# Altium PCB STM32H743I-EVAL2PCBDESIGN.PcbDoc (part 2 of 23)
Units mil, origin at the board's own origin, x right, y up, seen from the top; angles counter-clockwise.
Board outline 6558 x 5417 mil, 8 copper layers (L1_TOP, L2_GND, L3_HS1, L4_POWER, L5_SIG, L6_HS2, L7_GND, L8_BOTTOM), stack 61.368 mil thick; 620 components, 588 nets, 2945 pads, 1724 vias.
Unrouted connection lines stored in the file: 1.
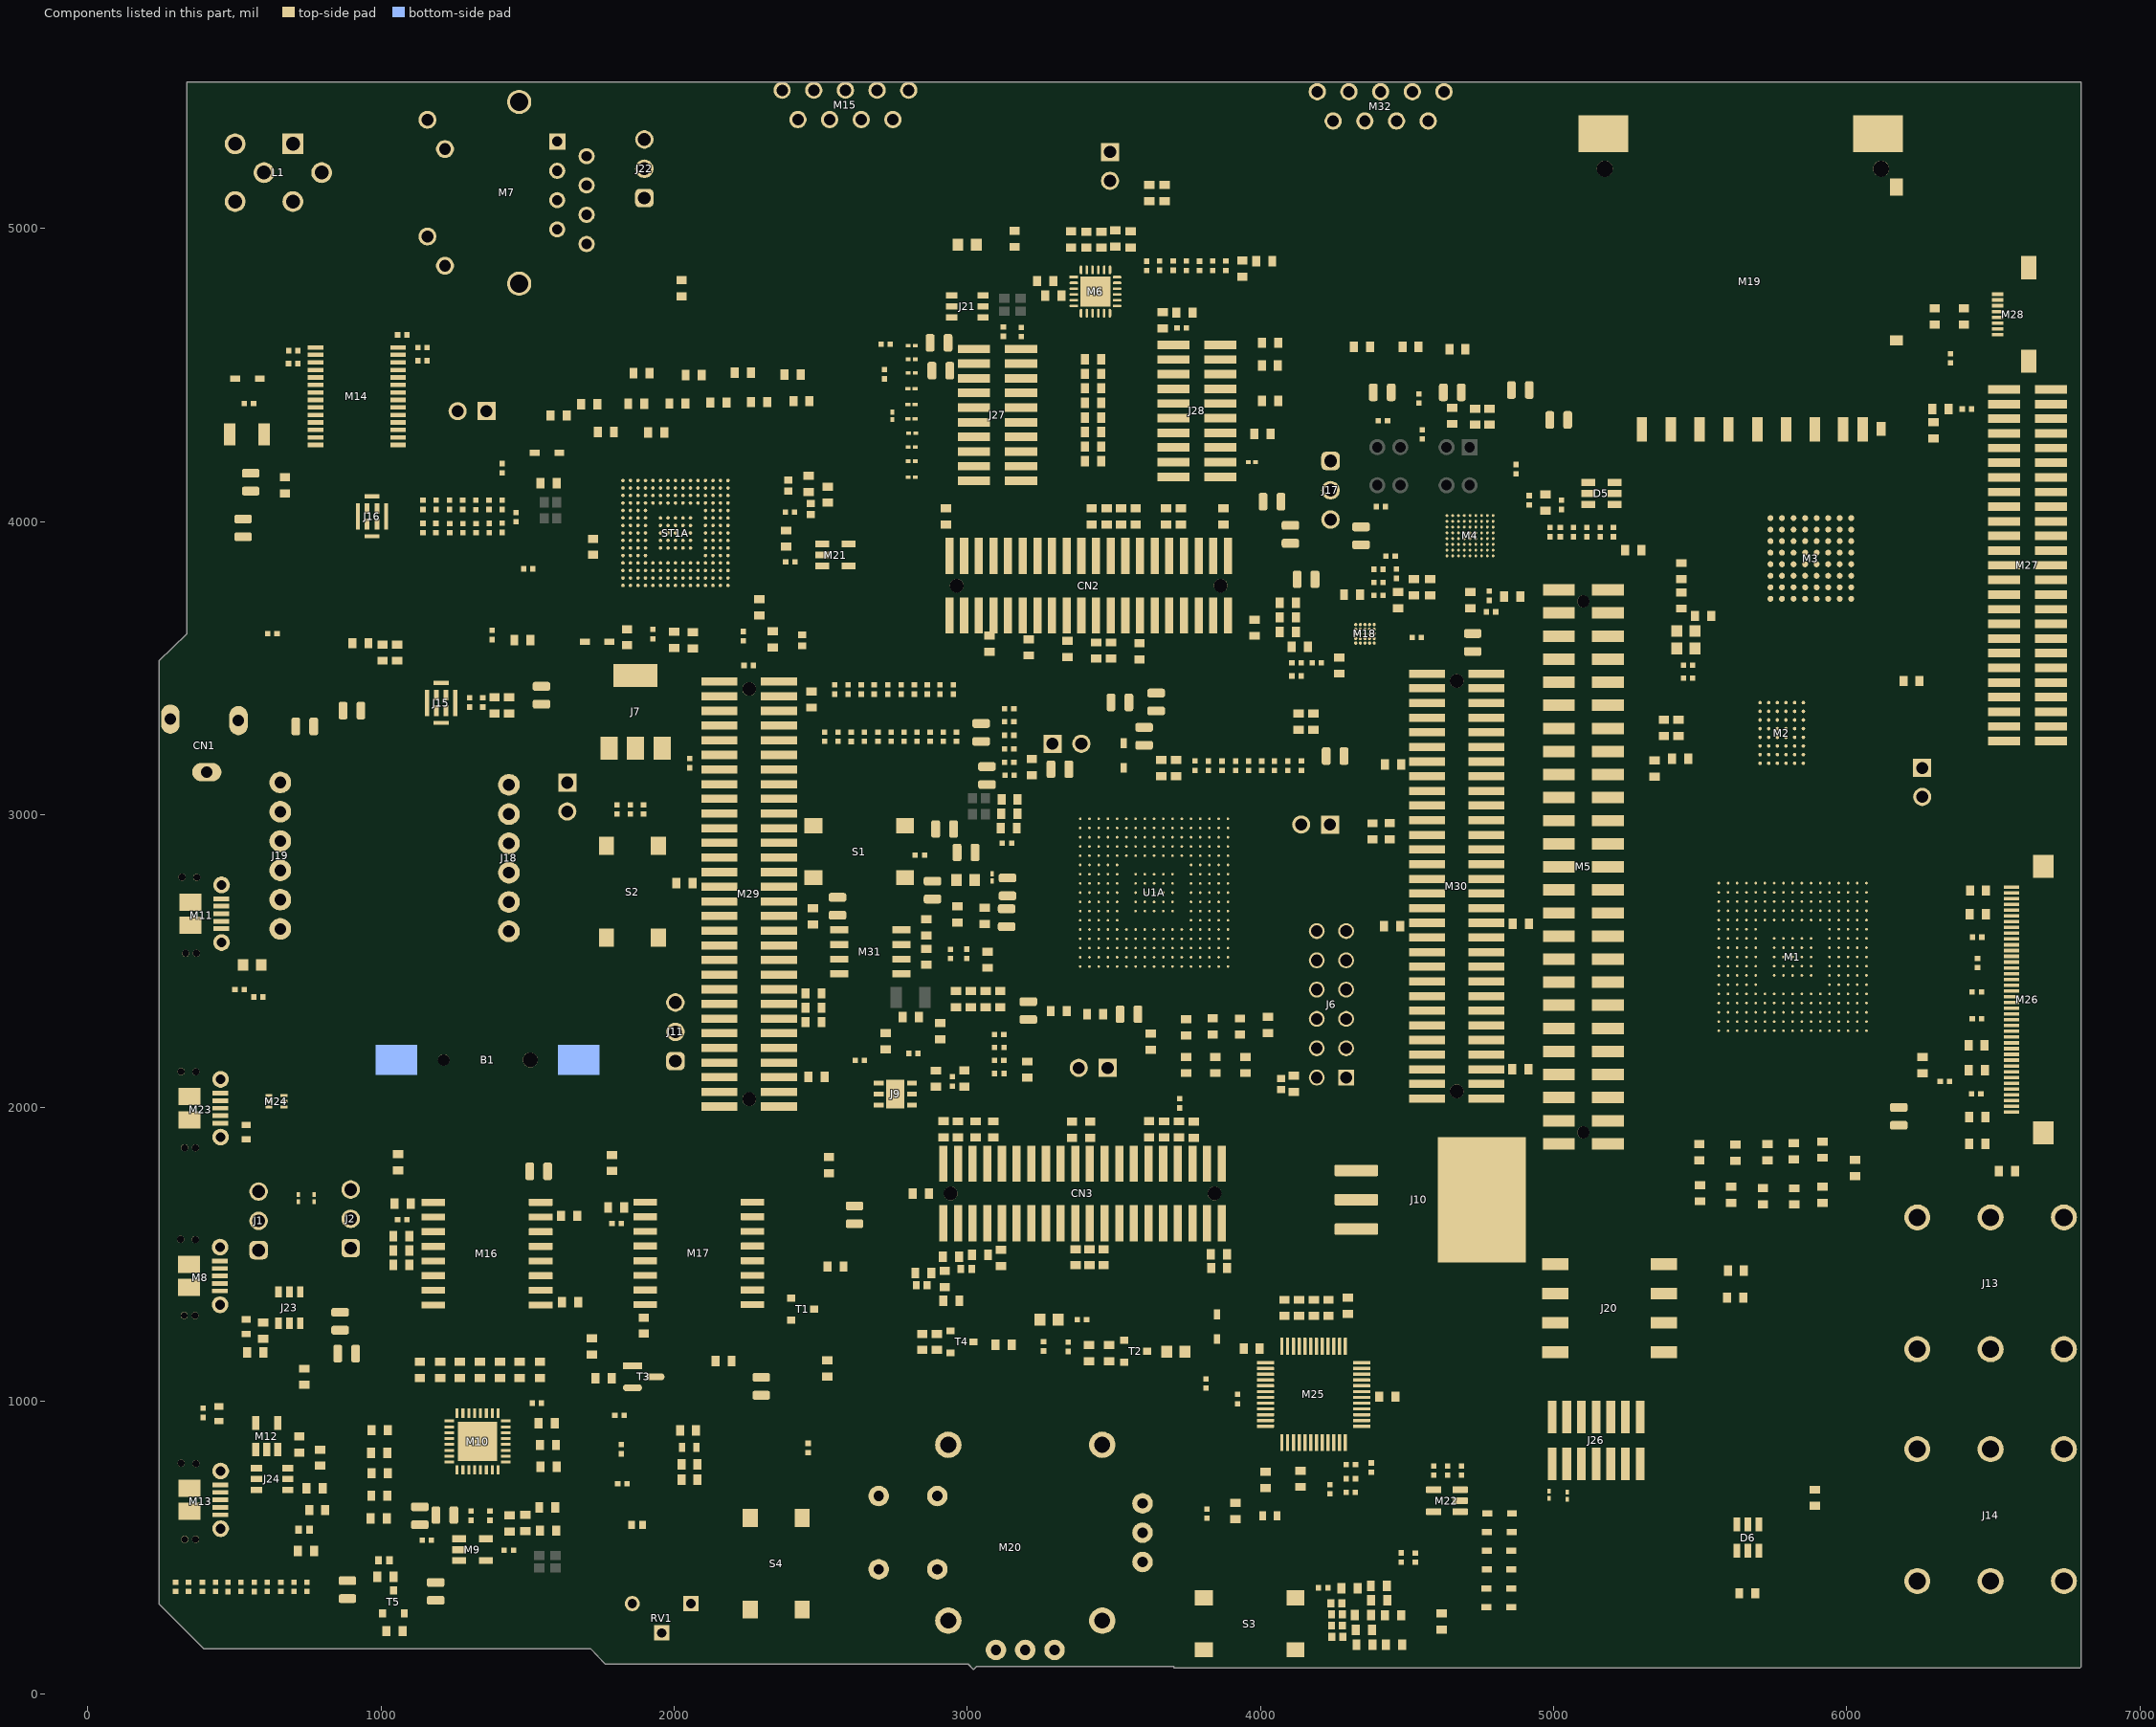
[diagram p8: the components of this part, seen from the top]

## Footprints (in the part's own frame and the unit in brackets; to place one, negate y for a bottom-side part, rotate by r counter-clockwise, add the part's x,y. Pads: shape width x height; smd on the part's side, far side on the other; paste and mask are expansions set on the pad) (continued)
FP-PTS645SH50SMTR92LFS-MFG [mm]
  rect 1.55x1.3 smd paste+0 mask+0: 1(-3.975,2.25) 2(3.975,2.25) 3(-3.975,-2.25) 4(3.975,-2.25)
  silkscreen extent -3,-3 3,3, body extent -4.63,-2.87 4.37,3.13, height 4.3
FP-QFN-6L-MFG [mm]
  rect 0.6x0.25 smd paste+0 mask+0: 1(-0.65,0.5) 2(-0.65,0) 3(-0.65,-0.5) 4(0.65,-0.5) 5(0.65,0) 6(0.65,0.5)
  body extent -1.05,-0.97 1.05,0.97, height 0.25
FP-SOT23-5L-7049676-MFG [mm]
  rect 1.2x0.6 smd paste+0 mask+0: 1(-1.15,0.95) 2(-1.15,0) 3(-1.15,-0.95) 4(1.15,-0.95) 5(1.15,0.95)
  silkscreen extent -0.18,-1.48 0.8,1.47, body extent -1.85,-1.58 1.85,1.57, height 0.25
FP-SOT23-6L-MFG [mm]
  rect 1.2x0.6 smd paste+0 mask+0: 1(-1.15,0.95) 2(-1.15,0) 3(-1.15,-0.95) 4(1.15,-0.95) 5(1.15,0) 6(1.15,0.95)
  silkscreen extent -0.18,-1.53 0.18,1.53, body extent -1.85,-1.63 1.85,1.63, height 0.25
FP-SOT23-IPC_A [mm]
  rect 1.655x0.602 smd paste+0 mask+0: 1(-0.975,0.95)
  rrect100% 1.655x0.602 smd paste+0 mask+0: 2(-0.975,-0.95) 3(0.975,0)
  body extent -2.3,-1.95 2.3,1.95, height 0.25
FP-SOT23-MFG [mm]
  rect 0.7x0.6 smd paste-1000 mask+0: 1(-1,0.95) 2(-1,-0.95) 3(1,0)
  silkscreen extent -0.7,-1.5 0.7,1.5, body extent -1.5,-1.65 1.5,1.65, height 0.25
FP-TFBGA240+25-A07U-MFG [mm]
  round 0.225 smd paste-1000 mask+0: A1(-6.4,6.4) A2(-5.6,6.4) A3(-4.8,6.4) A4(-4,6.4) A5(-3.2,6.4) A6(-2.4,6.4) A7(-1.6,6.4) A8(-0.8,6.4) A9(0,6.4) A10(0.8,6.4) A11(1.6,6.4) A12(2.4,6.4) A13(3.2,6.4) A14(4,6.4) A15(4.8,6.4) A16(5.6,6.4) A17(6.4,6.4) B1(-6.4,5.6) B2(-5.6,5.6) B3(-4.8,5.6) B4(-4,5.6) B5(-3.2,5.6) B6(-2.4,5.6) B7(-1.6,5.6) B8(-0.8,5.6) B9(0,5.6) B10(0.8,5.6) B11(1.6,5.6) B12(2.4,5.6) B13(3.2,5.6) B14(4,5.6) B15(4.8,5.6) B16(5.6,5.6) B17(6.4,5.6) C1(-6.4,4.8) C2(-5.6,4.8) C3(-4.8,4.8) C4(-4,4.8) C5(-3.2,4.8) C6(-2.4,4.8) C7(-1.6,4.8) C8(-0.8,4.8) C9(0,4.8) C10(0.8,4.8) C11(1.6,4.8) C12(2.4,4.8) C13(3.2,4.8) C14(4,4.8) C15(4.8,4.8) C16(5.6,4.8) C17(6.4,4.8) D1(-6.4,4) D2(-5.6,4) D3(-4.8,4) D4(-4,4) D5(-3.2,4) D6(-2.4,4) D7(-1.6,4) D8(-0.8,4) D9(0,4) D10(0.8,4) D11(1.6,4) D12(2.4,4) D13(3.2,4) D14(4,4) D15(4.8,4) D16(5.6,4) D17(6.4,4) E1(-6.4,3.2) E2(-5.6,3.2) E3(-4.8,3.2) E4(-4,3.2) E5(-3.2,3.2) E6(-2.4,3.2) E7(-1.6,3.2) E8(-0.8,3.2) E9(0,3.2) E10(0.8,3.2) E11(1.6,3.2) E12(2.4,3.2) E13(3.2,3.2) E14(4,3.2) E15(4.8,3.2) E16(5.6,3.2) E17(6.4,3.2) F1(-6.4,2.4) F2(-5.6,2.4) F3(-4.8,2.4) F4(-4,2.4) F5(-3.2,2.4) F13(3.2,2.4) F14(4,2.4) F15(4.8,2.4) F16(5.6,2.4) F17(6.4,2.4) G1(-6.4,1.6) G2(-5.6,1.6) G3(-4.8,1.6) G4(-4,1.6) G5(-3.2,1.6) G7(-1.6,1.6) G8(-0.8,1.6) G9(0,1.6) G10(0.8,1.6) G11(1.6,1.6) G13(3.2,1.6) G14(4,1.6) G15(4.8,1.6) G16(5.6,1.6) G17(6.4,1.6) H1(-6.4,0.8) H2(-5.6,0.8) H3(-4.8,0.8) H4(-4,0.8) H5(-3.2,0.8) H7(-1.6,0.8) H8(-0.8,0.8) H9(0,0.8) H10(0.8,0.8) H11(1.6,0.8) H13(3.2,0.8) H14(4,0.8) H15(4.8,0.8) H16(5.6,0.8) H17(6.4,0.8) J1(-6.4,0) J2(-5.6,0) J3(-4.8,0) J4(-4,0) J5(-3.2,0) J7(-1.6,0) J8(-0.8,0) J9(0,0) J10(0.8,0) J11(1.6,0) J13(3.2,0) J14(4,0) J15(4.8,0) J16(5.6,0) J17(6.4,0) K1(-6.4,-0.8) K2(-5.6,-0.8) K3(-4.8,-0.8) K4(-4,-0.8) K5(-3.2,-0.8) K7(-1.6,-0.8) K8(-0.8,-0.8) K9(0,-0.8) K10(0.8,-0.8) K11(1.6,-0.8) K13(3.2,-0.8) K14(4,-0.8) K15(4.8,-0.8) K16(5.6,-0.8) K17(6.4,-0.8) L1(-6.4,-1.6) L2(-5.6,-1.6) L3(-4.8,-1.6) L4(-4,-1.6) L5(-3.2,-1.6) L7(-1.6,-1.6) L8(-0.8,-1.6) L9(0,-1.6) L10(0.8,-1.6) L11(1.6,-1.6) L13(3.2,-1.6) L14(4,-1.6) L15(4.8,-1.6) L16(5.6,-1.6) L17(6.4,-1.6) M1(-6.4,-2.4) M2(-5.6,-2.4) M3(-4.8,-2.4) M4(-4,-2.4) M5(-3.2,-2.4) M13(3.2,-2.4) M14(4,-2.4) M15(4.8,-2.4) M16(5.6,-2.4) M17(6.4,-2.4) N1(-6.4,-3.2) N2(-5.6,-3.2) N3(-4.8,-3.2) N4(-4,-3.2) N5(-3.2,-3.2) N6(-2.4,-3.2) N7(-1.6,-3.2) N8(-0.8,-3.2) N9(0,-3.2) N10(0.8,-3.2) N11(1.6,-3.2) N12(2.4,-3.2) N13(3.2,-3.2) N14(4,-3.2) N15(4.8,-3.2) N16(5.6,-3.2) N17(6.4,-3.2) P1(-6.4,-4) P2(-5.6,-4) P3(-4.8,-4) P4(-4,-4) P5(-3.2,-4) P6(-2.4,-4) P7(-1.6,-4) P8(-0.8,-4) P9(0,-4) P10(0.8,-4) P11(1.6,-4) P12(2.4,-4) P13(3.2,-4) P14(4,-4) P15(4.8,-4) P16(5.6,-4) P17(6.4,-4) R1(-6.4,-4.8) R2(-5.6,-4.8) R3(-4.8,-4.8) R4(-4,-4.8) R5(-3.2,-4.8) R6(-2.4,-4.8) R7(-1.6,-4.8) R8(-0.8,-4.8) R9(0,-4.8) R10(0.8,-4.8) R11(1.6,-4.8) R12(2.4,-4.8) R13(3.2,-4.8) R14(4,-4.8) R15(4.8,-4.8) R16(5.6,-4.8) R17(6.4,-4.8) T1(-6.4,-5.6) T2(-5.6,-5.6) T3(-4.8,-5.6) T4(-4,-5.6) T5(-3.2,-5.6) T6(-2.4,-5.6) T7(-1.6,-5.6) T8(-0.8,-5.6) T9(0,-5.6) T10(0.8,-5.6) T11(1.6,-5.6) T12(2.4,-5.6) T13(3.2,-5.6) T14(4,-5.6) T15(4.8,-5.6) T16(5.6,-5.6) T17(6.4,-5.6) U1(-6.4,-6.4) U2(-5.6,-6.4) U3(-4.8,-6.4) U4(-4,-6.4) U5(-3.2,-6.4) U6(-2.4,-6.4) U7(-1.6,-6.4) U8(-0.8,-6.4) U9(0,-6.4) U10(0.8,-6.4) U11(1.6,-6.4) U12(2.4,-6.4) U13(3.2,-6.4) U14(4,-6.4) U15(4.8,-6.4) U16(5.6,-6.4) U17(6.4,-6.4)
  silkscreen extent -8.1,-7.07 7.07,7.07, body extent -7.57,-7.57 7.57,7.57, height 0.25
IC_STM32F723IEK6 [mm]
  round 0.3 smd mask+0.05: A1(-4.55,4.55) A2(-3.9,4.55) A3(-3.25,4.55) A4(-2.6,4.55) A5(-1.95,4.55) A6(-1.3,4.55) A7(-0.65,4.55) A8(0,4.55) A9(0.65,4.55) A10(1.3,4.55) A11(1.95,4.55) A12(2.6,4.55) A13(3.25,4.55) A14(3.9,4.55) A15(4.55,4.55) B1(-4.55,3.9) B2(-3.9,3.9) B3(-3.25,3.9) B4(-2.6,3.9) B5(-1.95,3.9) B6(-1.3,3.9) B7(-0.65,3.9) B8(0,3.9) B9(0.65,3.9) B10(1.3,3.9) B11(1.95,3.9) B12(2.6,3.9) B13(3.25,3.9) B14(3.9,3.9) B15(4.55,3.9) C1(-4.55,3.25) C2(-3.9,3.25) C3(-3.25,3.25) C4(-2.6,3.25) C5(-1.95,3.25) C6(-1.3,3.25) C7(-0.65,3.25) C8(0,3.25) C9(0.65,3.25) C10(1.3,3.25) C11(1.95,3.25) C12(2.6,3.25) C13(3.25,3.25) C14(3.9,3.25) C15(4.55,3.25) D1(-4.55,2.6) D2(-3.9,2.6) D3(-3.25,2.6) D4(-2.6,2.6) D5(-1.95,2.6) D6(-1.3,2.6) D7(-0.65,2.6) D8(0,2.6) D9(0.65,2.6) D10(1.3,2.6) D11(1.95,2.6) D12(2.6,2.6) D13(3.25,2.6) D14(3.9,2.6) D15(4.55,2.6) E1(-4.55,1.95) E2(-3.9,1.95) E3(-3.25,1.95) E4(-2.6,1.95) E12(2.6,1.95) E13(3.25,1.95) E14(3.9,1.95) E15(4.55,1.95) F1(-4.55,1.3) F2(-3.9,1.3) F3(-3.25,1.3) F4(-2.6,1.3) F6(-1.3,1.3) F7(-0.65,1.3) F8(0,1.3) F9(0.65,1.3) F10(1.3,1.3) F12(2.6,1.3) F13(3.25,1.3) F14(3.9,1.3) F15(4.55,1.3) G1(-4.55,0.65) G2(-3.9,0.65) G3(-3.25,0.65) G4(-2.6,0.65) G6(-1.3,0.65) G7(-0.65,0.65) G8(0,0.65) G9(0.65,0.65) G10(1.3,0.65) G12(2.6,0.65) G13(3.25,0.65) G14(3.9,0.65) G15(4.55,0.65) H1(-4.55,0) H2(-3.9,0) H3(-3.25,0) H4(-2.6,0) H6(-1.3,0) H7(-0.65,0) H8(0,0) H9(0.65,0) H10(1.3,0) H12(2.6,0) H13(3.25,0) H14(3.9,0) H15(4.55,0) J1(-4.55,-0.65) J2(-3.9,-0.65) J3(-3.25,-0.65) J4(-2.6,-0.65) J6(-1.3,-0.65) J7(-0.65,-0.65) J8(0,-0.65) J9(0.65,-0.65) J10(1.3,-0.65) J12(2.6,-0.65) J13(3.25,-0.65) J14(3.9,-0.65) J15(4.55,-0.65) K1(-4.55,-1.3) K2(-3.9,-1.3) K3(-3.25,-1.3) K4(-2.6,-1.3) K6(-1.3,-1.3) K7(-0.65,-1.3) K8(0,-1.3) K9(0.65,-1.3) K10(1.3,-1.3) K12(2.6,-1.3) K13(3.25,-1.3) K14(3.9,-1.3) K15(4.55,-1.3) L1(-4.55,-1.95) L2(-3.9,-1.95) L3(-3.25,-1.95) L4(-2.6,-1.95) L12(2.6,-1.95) L13(3.25,-1.95) L14(3.9,-1.95) L15(4.55,-1.95) M1(-4.55,-2.6) M2(-3.9,-2.6) M3(-3.25,-2.6) M4(-2.6,-2.6) M5(-1.95,-2.6) M6(-1.3,-2.6) M7(-0.65,-2.6) M8(0,-2.6) M9(0.65,-2.6) M10(1.3,-2.6) M11(1.95,-2.6) M12(2.6,-2.6) M13(3.25,-2.6) M14(3.9,-2.6) M15(4.55,-2.6) N1(-4.55,-3.25) N2(-3.9,-3.25) N3(-3.25,-3.25) N4(-2.6,-3.25) N5(-1.95,-3.25) N6(-1.3,-3.25) N7(-0.65,-3.25) N8(0,-3.25) N9(0.65,-3.25) N10(1.3,-3.25) N11(1.95,-3.25) N12(2.6,-3.25) N13(3.25,-3.25) N14(3.9,-3.25) N15(4.55,-3.25) P1(-4.55,-3.9) P2(-3.9,-3.9) P3(-3.25,-3.9) P4(-2.6,-3.9) P5(-1.95,-3.9) P6(-1.3,-3.9) P7(-0.65,-3.9) P8(0,-3.9) P9(0.65,-3.9) P10(1.3,-3.9) P11(1.95,-3.9) P12(2.6,-3.9) P13(3.25,-3.9) P14(3.9,-3.9) P15(4.55,-3.9) R1(-4.55,-4.55) R2(-3.9,-4.55) R3(-3.25,-4.55) R4(-2.6,-4.55) R5(-1.95,-4.55) R6(-1.3,-4.55) R7(-0.65,-4.55) R8(0,-4.55) R9(0.65,-4.55) R10(1.3,-4.55) R11(1.95,-4.55) R12(2.6,-4.55) R13(3.25,-4.55) R14(3.9,-4.55) R15(4.55,-4.55)
  silkscreen extent -5.6,4.65 -5.4,4.85, body extent -5,-5 5,5, height 0.6
ISSI-TF-BGA-48-9000X11000DE [mm] "BGA, 48-Balls, Body 11x9mm, Pitch 0.75mm"
  round 0.3 smd: A1(-1.875,2.625) A2(-1.125,2.625) A3(-0.375,2.625) A4(0.375,2.625) A5(1.125,2.625) A6(1.875,2.625) B1(-1.875,1.875) B2(-1.125,1.875) B3(-0.375,1.875) B4(0.375,1.875) B5(1.125,1.875) B6(1.875,1.875) C1(-1.875,1.125) C2(-1.125,1.125) C3(-0.375,1.125) C4(0.375,1.125) C5(1.125,1.125) C6(1.875,1.125) D1(-1.875,0.375) D2(-1.125,0.375) D3(-0.375,0.375) D4(0.375,0.375) D5(1.125,0.375) D6(1.875,0.375) E1(-1.875,-0.375) E2(-1.125,-0.375) E3(-0.375,-0.375) E4(0.375,-0.375) E5(1.125,-0.375) E6(1.875,-0.375) F1(-1.875,-1.125) F2(-1.125,-1.125) F3(-0.375,-1.125) F4(0.375,-1.125) F5(1.125,-1.125) F6(1.875,-1.125) G1(-1.875,-1.875) G2(-1.125,-1.875) G3(-0.375,-1.875) G4(0.375,-1.875) G5(1.125,-1.875) G6(1.875,-1.875) H1(-1.875,-2.625) H2(-1.125,-2.625) H3(-0.375,-2.625) H4(0.375,-2.625) H5(1.125,-2.625) H6(1.875,-2.625)
  silkscreen extent -5.27,-5.5 4.5,5.5, body extent -4.5,-5.5 4.5,5.5, height 1.2
JST_B2B-XH-A [mm]
  rect 1.575x1.575 / inner round 1.575 / far side rect 1.575x1.575 hole 1.05: 1(1.25,-0.525)
  round 1.575 hole 1.05: 2(-1.25,-0.525)
  silkscreen extent -3.7,-2.88 3.7,2.88, body extent -3.57,-4.02 3.83,1.73, height 7.86
LBGA64_11X13_PC_MRN-M [mil]
  round 20 smd paste+0 mask+0: A1(-137.8,137.8) A2(-98.43,137.8) A3(-59.06,137.8) A4(-19.69,137.8) A5(19.68,137.8) A6(59.06,137.8) A7(98.43,137.8) A8(137.8,137.8) B1(-137.8,98.43) B2(-98.43,98.43) B3(-59.06,98.43) B4(-19.69,98.43) B5(19.68,98.43) B6(59.06,98.43) B7(98.43,98.43) B8(137.8,98.43) C1(-137.8,59.06) C2(-98.43,59.06) C3(-59.06,59.06) C4(-19.69,59.06) C5(19.68,59.06) C6(59.06,59.06) C7(98.43,59.06) C8(137.8,59.06) D1(-137.8,19.69) D2(-98.43,19.69) D3(-59.06,19.69) D4(-19.69,19.69) D5(19.68,19.69) D6(59.06,19.69) D7(98.43,19.69) D8(137.8,19.69) E1(-137.8,-19.68) E2(-98.43,-19.68) E3(-59.06,-19.68) E4(-19.69,-19.68) E5(19.68,-19.68) E6(59.06,-19.68) E7(98.43,-19.68) E8(137.8,-19.68) F1(-137.8,-59.06) F2(-98.43,-59.06) F3(-59.06,-59.06) F4(-19.69,-59.06) F5(19.68,-59.06) F6(59.06,-59.06) F7(98.43,-59.06) F8(137.8,-59.06) G1(-137.8,-98.43) G2(-98.43,-98.43) G3(-59.06,-98.43) G4(-19.69,-98.43) G5(19.68,-98.43) G6(59.06,-98.43) G7(98.43,-98.43) G8(137.8,-98.43) H1(-137.8,-137.8) H2(-98.43,-137.8) H3(-59.06,-137.8) H4(-19.69,-137.8) H5(19.68,-137.8) H6(59.06,-137.8) H7(98.43,-137.8) H8(137.8,-137.8)
  silkscreen extent -228,-268 228,268, body extent -219,-258 219,258, height 55
LEDGREEN [mm]
  rect 0.6x0.7 smd: 1(-0.475,0) 2(0.475,0)
  body extent -0.5,-0.3 0.5,0.3, height 0.21
LEDRED [mm]
  rect 0.6x0.7 smd: 1(-0.475,0) 2(0.475,0)
  body extent -0.53,-0.3 0.47,0.3, height 0.21
MLE_TSHC-106-D-06-240-F-LF [mil]
  rect 54x54 / inner round 54 / far side rect 54x54 hole 40 mask+4.02: 01(-250,-50)
  round 54 hole 40 mask+4.02: 02(-250,50) 03(-150,-50) 04(-150,50) 05(-50,-50) 06(-50,50) 07(50,-50) 08(50,50) 09(150,-50) 10(150,50) 11(250,-50) 12(250,50)
  body extent -300,-99 300,99, height 340
NET_TIE [mil]
  rrect50% 30x60 smd paste-30 mask+0: 1(-1,0) 2(60,0)
  L1_TOP region: 0,30 60,30 60,-30 0,-30
NEUTRIK_NRJ6HF [mm]
  round 2.25 hole 1.5: 1(6.35,5.715) 2(0,-5.715) 3(-6.35,5.715) 4(0,5.715) 10(6.35,-5.715) NC(-6.35,-5.715)
  silkscreen extent -13.7,-7.95 10.6,8.93, body extent -13.7,-7.95 19.5,7.81, height 12.7
POT_3386P [mil]
  round 52 / inner round 60 / far side round 52 hole 32 paste-99999 mask+0: 1(0,0)
  rect 52x52 / inner round 60 / far side rect 52x52 hole 32 paste-99999 mask+0: 2(100,-100) 3(200,0)
  silkscreen extent -142,-192 292,193, body extent -87,-200 290,187, height 392
PPPC061LGBN-RC [mil]
  round 74 hole 40: 1(-50,250) 2(-50,150) 3(-50,50) 4(-50,-50) 5(-50,-150) 6(-50,-250)
  body extent -76,-315 330,305, height 100
PULS-J00XXD21XNL-B-12 [mm] "RJ45, 12-Leads, Body 16.26x21.59mm, Pitch 1.27mm"
  rect 1.4x1.4 hole 0.89: 1(4.445,-6.35)
  round 1.4 hole 0.89: 2(3.175,-8.89) 3(1.905,-6.35) 4(0.635,-8.89) 5(-0.635,-6.35) 6(-1.905,-8.89) 7(-3.175,-6.35) 8(-4.445,-8.89)
  round 1.55 hole 1.02: 9(6.325,4.9) 10(3.785,3.38) 11(-3.785,4.9) 12(-6.325,3.38)
  round 2.1 hole 1.6: 13(7.875,-3.05) 14(-7.875,-3.05)
  silkscreen extent -8.13,-10.8 8.13,10.79, body extent -8.13,-10.79 8.13,10.8, height 17.13
QFN32_5X5MC_MCH [mil]
  rect 32x10 smd paste+0 mask+0: 1(-96.5,70) 2(-96.5,50) 3(-96.5,30) 4(-96.5,10) 5(-96.5,-10) 6(-96.5,-30) 7(-96.5,-50) 8(-96.5,-70) 17(96.5,-70) 18(96.5,-50) 19(96.5,-30) 20(96.5,-10) 21(96.5,10) 22(96.5,30) 23(96.5,50) 24(96.5,70)
  rect 10x32 smd paste+0 mask+0: 9(-70,-96.5) 10(-50,-96.5) 11(-30,-96.5) 12(-10,-96.5) 13(10,-96.5) 14(30,-96.5) 15(50,-96.5) 16(70,-96.5) 25(70,96.5) 26(50,96.5) 27(30,96.5) 28(10,96.5) 29(-10,96.5) 30(-30,96.5) 31(-50,96.5) 32(-70,96.5)
  rect 134x134 smd paste-66.5 mask-66.5: 33(0,0)
  silkscreen extent -103,-132 132,132, body extent -101,-101 101,101, height 65
QFP50P900X900X160-48N [mm]
  rrect25% 1.49x0.28 smd: 1(-4.17,2.75) 2(-4.17,2.25) 3(-4.17,1.75) 4(-4.17,1.25) 5(-4.17,0.75) 6(-4.17,0.25) 7(-4.17,-0.25) 8(-4.17,-0.75) 9(-4.17,-1.25) 10(-4.17,-1.75) 11(-4.17,-2.25) 12(-4.17,-2.75) 25(4.17,-2.75) 26(4.17,-2.25) 27(4.17,-1.75) 28(4.17,-1.25) 29(4.17,-0.75) 30(4.17,-0.25) 31(4.17,0.25) 32(4.17,0.75) 33(4.17,1.25) 34(4.17,1.75) 35(4.17,2.25) 36(4.17,2.75)
  rrect25% 0.28x1.49 smd: 13(-2.75,-4.17) 14(-2.25,-4.17) 15(-1.75,-4.17) 16(-1.25,-4.17) 17(-0.75,-4.17) 18(-0.25,-4.17) 19(0.25,-4.17) 20(0.75,-4.17) 21(1.25,-4.17) 22(1.75,-4.17) 23(2.25,-4.17) 24(2.75,-4.17) 37(2.75,4.17) 38(2.25,4.17) 39(1.75,4.17) 40(1.25,4.17) 41(0.75,4.17) 42(0.25,4.17) 43(-0.25,4.17) 44(-0.75,4.17) 45(-1.25,4.17) 46(-1.75,4.17) 47(-2.25,4.17) 48(-2.75,4.17)
  silkscreen extent -5.96,-3.55 3.55,3.55, body extent -4.5,-4.5 4.5,4.5, height 0.72
RESC1608X55X25NL10T15 [mm] "Chip Resistor, 2-Leads, Body 1.70x0.90mm, IPC Medium Density"
  rect 0.7x0.9 smd: 1(-0.7,0) 2(0.7,0)
  body extent -0.85,-0.45 0.85,0.45, height 0.55
SAMTEC_FTR-120-03-L-D-LC [mm]
  rect 0.711x3.125 smd: 01(-12.065,-2.578) 02(-12.065,2.578) 03(-10.795,-2.578) 04(-10.795,2.578) 05(-9.525,-2.578) 06(-9.525,2.578) 07(-8.255,-2.578) 08(-8.255,2.578) 09(-6.985,-2.578) 10(-6.985,2.578) 11(-5.715,-2.578) 12(-5.715,2.578) 13(-4.445,-2.578) 14(-4.445,2.578) 15(-3.175,-2.578) 16(-3.175,2.578) 17(-1.905,-2.578) 18(-1.905,2.578) 19(-0.635,-2.578) 20(-0.635,2.578) 21(0.635,-2.578) 22(0.635,2.578) 23(1.905,-2.578) 24(1.905,2.578) 25(3.175,-2.578) 26(3.175,2.578) 27(4.445,-2.578) 28(4.445,2.578) 29(5.715,-2.578) 30(5.715,2.578) 31(6.985,-2.578) 32(6.985,2.578) 33(8.255,-2.578) 34(8.255,2.578) 35(9.525,-2.578) 36(9.525,2.578) 37(10.795,-2.578) 38(10.795,2.578) 39(12.065,-2.578) 40(12.065,2.578)
  round 1.19 hole 1.19 unplated: ""(-11.43,0) ""(11.43,0)
  silkscreen extent -12.7,-5 12.7,0.66, body extent -12.83,-3.76 12.57,3.76, height 5.47
SAMTEC_FTR-130-03-L-D-LC [mm]
  rect 0.711x3.125 smd: 01(-18.415,-2.578) 02(-18.415,2.578) 03(-17.145,-2.578) 04(-17.145,2.578) 05(-15.875,-2.578) 06(-15.875,2.578) 07(-14.605,-2.578) 08(-14.605,2.578) 09(-13.335,-2.578) 10(-13.335,2.578) 11(-12.065,-2.578) 12(-12.065,2.578) 13(-10.795,-2.578) 14(-10.795,2.578) 15(-9.525,-2.578) 16(-9.525,2.578) 17(-8.255,-2.578) 18(-8.255,2.578) 19(-6.985,-2.578) 20(-6.985,2.578) 21(-5.715,-2.578) 22(-5.715,2.578) 23(-4.445,-2.578) 24(-4.445,2.578) 25(-3.175,-2.578) 26(-3.175,2.578) 27(-1.905,-2.578) 28(-1.905,2.578) 29(-0.635,-2.578) 30(-0.635,2.578) 31(0.635,-2.578) 32(0.635,2.578) 33(1.905,-2.578) 34(1.905,2.578) 35(3.175,-2.578) 36(3.175,2.578) 37(4.445,-2.578) 38(4.445,2.578) 39(5.715,-2.578) 40(5.715,2.578) 41(6.985,-2.578) 42(6.985,2.578) 43(8.255,-2.578) 44(8.255,2.578) 45(9.525,-2.578) 46(9.525,2.578) 47(10.795,-2.578) 48(10.795,2.578) 49(12.065,-2.578) 50(12.065,2.578) 51(13.335,-2.578) 52(13.335,2.578) 53(14.605,-2.578) 54(14.605,2.578) 55(15.875,-2.578) 56(15.875,2.578) 57(17.145,-2.578) 58(17.145,2.578) 59(18.415,-2.578) 60(18.415,2.578)
  round 1.19 hole 1.19 unplated: ""(-17.78,0) ""(17.78,0)
  silkscreen extent -19.05,-5 19.05,0.66, body extent -19.18,-3.76 18.92,3.76, height 5.73
SAMTEC_FTSH-125-01-X-DV-K [mil]
  rect 29x110 smd paste+0 mask+4.02: 01(-600,-80) 02(-600,80) 03(-550,-80) 04(-550,80) 05(-500,-80) 06(-500,80) 07(-450,-80) 08(-450,80) 09(-400,-80) 10(-400,80) 11(-350,-80) 12(-350,80) 13(-300,-80) 14(-300,80) 15(-250,-80) 16(-250,80) 17(-200,-80) 18(-200,80) 19(-150,-80) 20(-150,80) 21(-100,-80) 22(-100,80) 23(-50,-80) 24(-50,80) 25(0,-80) 26(0,80) 27(50,-80) 28(50,80) 29(100,-80) 30(100,80) 31(150,-80) 32(150,80) 33(200,-80) 34(200,80) 35(250,-80) 36(250,80) 37(300,-80) 38(300,80) 39(350,-80) 40(350,80) 41(400,-80) 42(400,80) 43(450,-80) 44(450,80) 45(500,-80) 46(500,80) 47(550,-80) 48(550,80) 49(600,-80) 50(600,80)
  silkscreen extent -604,-178 -596,-170, body extent -635,-110 615,120, height 324
SAMTEC_SSM-104-X-DH [mm]
  rect 1.02x2.285 smd: 01(3.81,-4.697) 02(3.81,4.697) 03(1.27,-4.697) 04(1.27,4.697) 05(-1.27,-4.697) 06(-1.27,4.697) 07(-3.81,-4.697) 08(-3.81,4.697)
  body extent -5.21,-5.46 4.95,5.46, height 5.35
SMTC-FTSH-110-01-L-DV_V [mm] "CONN, 20-Leads, Body 12.7x3.43mm, Pitch 1.27mm"
  rect 0.74x2.79 smd: 1(-5.715,-2.035) 2(-5.715,2.035) 3(-4.445,-2.035) 4(-4.445,2.035) 5(-3.175,-2.035) 6(-3.175,2.035) 7(-1.905,-2.035) 8(-1.905,2.035) 9(-0.635,-2.035) 10(-0.635,2.035) 11(0.635,-2.035) 12(0.635,2.035) 13(1.905,-2.035) 14(1.905,2.035) 15(3.175,-2.035) 16(3.175,2.035) 17(4.445,-2.035) 18(4.445,2.035) 19(5.715,-2.035) 20(5.715,2.035)
  body extent -6.35,-2.92 6.35,2.92, height 5.97
SOIC127P1032X265-16N [mm]
  rrect8% 2.04x0.6 smd paste+0 mask+0.102: 1(-4.655,4.445) 2(-4.655,3.175) 3(-4.655,1.905) 4(-4.655,0.635) 5(-4.655,-0.635) 6(-4.655,-1.905) 7(-4.655,-3.175) 8(-4.655,-4.445) 9(4.655,-4.445) 10(4.655,-3.175) 11(4.655,-1.905) 12(4.655,-0.635) 13(4.655,0.635) 14(4.655,1.905) 15(4.655,3.175) 16(4.655,4.445)
  silkscreen extent -3.74,-5.16 3.74,5.16, body extent -5.16,-5.15 5.16,5.15, height 2.36
SON95P300X300X100-7N [mm]
  rect 0.84x0.42 smd: 1(-1.435,0.95) 2(-1.435,0) 3(-1.435,-0.95) 4(1.435,-0.95) 5(1.435,0) 6(1.435,0.95)
  rect 1.6x2.5 smd paste-2: 7(0,0)
  silkscreen extent -2.75,-1.5 1.5,1.5, body extent -1.5,-1.5 1.5,1.5, height 1
SOT23-6L_STM [mil]
  rect 38.5x22 smd paste+0 mask+0: 1(-53.75,37.4) 2(-53.75,0) 3(-53.75,-37.4) 4(53.75,-37.4) 5(53.75,0) 6(53.75,37.4)
  body extent -59,-60 59,60, height 57
SOT95P280X145-5N [mm]
  rrect25% 1.32x0.59 smd: 1(-1.145,0.95) 2(-1.145,0) 3(-1.145,-0.95) 4(1.145,-0.95) 5(1.145,0.95)
  silkscreen extent -0.8,-1.6 0.8,1.6, body extent -1.4,-1.46 1.4,1.46, height 1.45
SOT230P700X180-4N [mm]
  rect 1.5x2 smd paste+0 mask+0.102: 1(-2.3,-3.15) 2(0,-3.15) 3(2.3,-3.15)
  rect 3.8x2 smd paste+0 mask+0.102: 4(0,3.15)
  silkscreen extent -3.35,-1.85 3.35,1.85, body extent -3.12,-3.5 3.38,3.5, height 1.71
SSOP28_STM-L [mil]
  rect 53x15 smd paste+0 mask+0: 1(-141,166.34) 2(-141,140.75) 3(-141,115.16) 4(-141,89.57) 5(-141,63.98) 6(-141,38.39) 7(-141,12.8) 8(-141,-12.8) 9(-141,-38.39) 10(-141,-63.98) 11(-141,-89.57) 12(-141,-115.16) 13(-141,-140.75) 14(-141,-166.34) 15(141,-166.34) 16(141,-140.75) 17(141,-115.16) 18(141,-89.57) 19(141,-63.98) 20(141,-38.39) 21(141,-12.8) 22(141,12.8) 23(141,38.39) 24(141,63.98) 25(141,89.57) 26(141,115.16) 27(141,140.75) 28(141,166.34)
  silkscreen extent -115,-212 115,212, body extent -161,-206 161,206, height 79
TE_1939870-1 [mm]
  rect 0.9x2.1 smd: 1(6.255,22.6) 2(3.755,22.6) 3(1.255,22.6) 4(-1.245,22.6) 5(-3.745,22.6) 6(-6.245,22.6) 7(-8.67,22.6) 8(-10.37,22.6) 9(8.755,22.6)
  rect 0.8x1.2 smd: 10(-11.97,22.55)
  rect 1.13x0.9 smd: 11(-13.285,14.88)
  rect 1.13x1.5 smd: 12(-13.285,1.57)
  rect 4.32x3.2 smd: SH1(12.09,-3.05) SH2(-11.69,-3.05)
  round 1.4 hole 1.4 unplated: ""(-11.97,0) ""(11.97,0)
  Keep-Out Layer region: 14.25,-5.65 12.15,-5.65 12.15,-4.65 14.25,-4.65
  Keep-Out Layer region: -12.15,-5.65 -13.85,-5.65 -13.85,-4.65 -12.15,-4.65
  Keep-Out Layer region: -13.55,8.65 -13.95,8.65 -13.95,13.15 -13.55,13.15
  Keep-Out Layer region: -9.87,15.8 -10.87,15.8 -10.87,17.3 -9.87,17.3
  Keep-Out Layer region: -8.17,15.8 -9.17,15.8 -9.17,17.3 -8.17,17.3
  Keep-Out Layer region: -5.745,15.8 -6.745,15.8 -6.745,17.3 -5.745,17.3
  Keep-Out Layer region: -3.245,15.8 -4.245,15.8 -4.245,17.3 -3.245,17.3
  Keep-Out Layer region: -0.595,15.5 -1.895,15.5 -1.895,17 -0.595,17
  Keep-Out Layer region: 1.905,15.5 0.605,15.5 0.605,17 1.905,17
  Keep-Out Layer region: 4.255,15.8 3.255,15.8 3.255,17.3 4.255,17.3
  Keep-Out Layer region: 6.755,16.1 5.755,16.1 5.755,17.6 6.755,17.6
  Keep-Out Layer region: 9.255,13.5 8.255,13.5 8.255,15 9.255,15
  silkscreen extent -13.75,-6.45 13.75,24.3, body extent -13.96,-7.22 13.72,22.48, height 2.33
TO254P1524X483-4N [mm]
  rrect25% 3.79x0.99 smd: 1(-6.4,2.54) 2(-6.4,0) 3(-6.4,-2.54)
  rect 7.62x10.84 smd paste-6: 4(4.48,0)
  silkscreen extent -9.1,-5.08 0.35,5.08, body extent -7.62,-5.08 7.62,5.08, height 4.83
W-CSP-72_4P521X4P033X0P546_CIR [mm]
  round 0.244 smd paste+0 mask+0: A1(-2,1.75) A2(-1.5,1.75) A3(-1,1.75) A4(-0.5,1.75) A5(0,1.75) A6(0.5,1.75) A7(1,1.75) A8(1.5,1.75) A9(2,1.75) B1(-2,1.25) B2(-1.5,1.25) B3(-1,1.25) B4(-0.5,1.25) B5(0,1.25) B6(0.5,1.25) B7(1,1.25) B8(1.5,1.25) B9(2,1.25) C1(-2,0.75) C2(-1.5,0.75) C3(-1,0.75) C4(-0.5,0.75) C5(0,0.75) C6(0.5,0.75) C7(1,0.75) C8(1.5,0.75) C9(2,0.75) D1(-2,0.25) D2(-1.5,0.25) D3(-1,0.25) D4(-0.5,0.25) D5(0,0.25) D6(0.5,0.25) D7(1,0.25) D8(1.5,0.25) D9(2,0.25) E1(-2,-0.25) E2(-1.5,-0.25) E3(-1,-0.25) E4(-0.5,-0.25) E5(0,-0.25) E6(0.5,-0.25) E7(1,-0.25) E8(1.5,-0.25) E9(2,-0.25) F1(-2,-0.75) F2(-1.5,-0.75) F3(-1,-0.75) F4(-0.5,-0.75) F5(0,-0.75) F6(0.5,-0.75) F7(1,-0.75) F8(1.5,-0.75) F9(2,-0.75) G1(-2,-1.25) G2(-1.5,-1.25) G3(-1,-1.25) G4(-0.5,-1.25) G5(0,-1.25) G6(0.5,-1.25) G7(1,-1.25) G8(1.5,-1.25) G9(2,-1.25) H1(-2,-1.75) H2(-1.5,-1.75) H3(-1,-1.75) H4(-0.5,-1.75) H5(0,-1.75) H6(0.5,-1.75) H7(1,-1.75) H8(1.5,-1.75) H9(2,-1.75)
  body extent -2.26,-2.02 2.26,2.02, height 0.59
WLCSP25_NEX [mil]
  round 11 smd paste+0 mask+0: A1(-31.5,31.5) A2(-15.75,31.5) A3(0,31.5) A4(15.75,31.5) A5(31.5,31.5) B1(-31.5,15.75) B2(-15.75,15.75) B3(0,15.75) B4(15.75,15.75) B5(31.5,15.75) C1(-31.5,0) C2(-15.75,0) C3(0,0) C4(15.75,0) C5(31.5,0) D1(-31.5,-15.75) D2(-15.75,-15.75) D3(0,-15.75) D4(15.75,-15.75) D5(31.5,-15.75) E1(-31.5,-31.5) E2(-15.75,-31.5) E3(0,-31.5) E4(15.75,-31.5) E5(31.5,-31.5)
  body extent -41,-41 41,41, height 22
XDCR_COM-09032 [mil]
  round 70 hole 35: 1(-400,100) 2(-400,0) 3(-400,-100) 4(-100,-400) 5(0,-400) 6(100,-400)
  round 90 hole 55: 7(-300,262.5) 8(-300,-262.5) S3(300,-262.5) S4(300,262.5)
  round 70 hole 35.43: B1A(-125,500) B1B(125,500) B2A(-125,300) B2B(125,300)
  silkscreen extent -242,-437 374,530, body extent -514,-530 535,557, height 1191

## Part data
B1: "Holder (Open) 1 Button cell Ø12.5mm 1220 SMD PCBinstall，base mount，SMD mount 4mm(height)", Color=Black, Manufacturer=Keystone, Max Operating Temperature=145°C, Min Operating Temperature=-50°C, Supplier Part Number=36-1056-ND, Category="Batteries and Accessories", ComponentLink1Description=https://datasheet.octopart.com:443/1056-Keystone-datasheet-15715033.pdf?src-supplier=Future+Electronics, ComponentLink1URL=https://datasheet.octopart.com:443/1056-Keystone-datasheet-15715033.pdf?src-supplier=Future+Electronics, ComponentLink2Description=https://datasheet.octopart.com:443/1056-Keystone-datasheet-8326175.pdf?src-supplier=Future+Electronics, ComponentLink2URL=https://datasheet.octopart.com:443/1056-Keystone-datasheet-8326175.pdf?src-supplier=Future+Electronics, ComponentLink3Description=https://datasheet.octopart.com:443/1056-Keystone-datasheet-137916583.pdf?src-supplier=LKR, ComponentLink3URL=https://datasheet.octopart.com:443/1056-Keystone-datasheet-137916583.pdf?src-supplier=LKR, ComponentLink4Description=https://datasheet.octopart.com:443/1056-Keystone-datasheet-137320296.pdf?src-supplier=Sager+Electronics, ComponentLink4URL=https://datasheet.octopart.com:443/1056-Keystone-datasheet-137320296.pdf?src-supplier=Sager+Electronics, ComponentLink5Description=https://datasheet.octopart.com:443/1056-Keystone-datasheet-62112666.pdf?src-supplier=RS+(Formerly+Allied+Electronics), ComponentLink5URL=https://datasheet.octopart.com:443/1056-Keystone-datasheet-62112666.pdf?src-supplier=RS+(Formerly+Allied+Electronics), ComponentLink6Description=https://datasheet.octopart.com:443/1056-Keystone-datasheet-21202752.pdf?src-supplier=Newark, ComponentLink6URL=https://datasheet.octopart.com:443/1056-Keystone-datasheet-21202752.pdf?src-supplier=Newark, ComponentLink7Description=https://datasheet.octopart.com:443/1056-Keystone-datasheet-17577351.pdf?src-supplier=TME, ComponentLink7URL=https://datasheet.octopart.com:443/1056-Keystone-datasheet-17577351.pdf?src-supplier=TME, ComponentLink8Description=https://datasheet.octopart.com:443/1056-Keystone-datasheet-176783336.pdf?src-supplier=SOS+electronic, ComponentLink8URL=https://datasheet.octopart.com:443/1056-Keystone-datasheet-176783336.pdf?src-supplier=SOS+electronic, Lead Free="Lead Free", Lifecycle Status=Production, Manufacturer Part Number=1056, Mounting Technology="PCB, Surface Mount", Number of Batteries=1, Number of Cells=1, Pricing="1=1.1, 1000=0.47938, 2500=0.44516, 5000=0.4209 (USD)", REACH SVHC=Yes, RoHS=Compliant, Stock=65166, Supplier=DigiKey, Termination=SMD/SMT
C1 C2: library part CC0603CRNPO9BN3R9, "Surface Mount Ceramic Multilayer Capacitor 3.9pF 0.25pF C0G 50V 0603 Paper T/R", Case Code (Imperial)=0603, Case Code (Metric)=1608, Dielectric=C0G, Dielectric Material=Ceramic, Insulation Resistance=100GΩ, Manufacturer="Yageo Group", Max Operating Temperature=125°C, Min Operating Temperature=-55°C, Supplier Part Number=311-3857-1-ND, Temperature Coefficient=30ppm/°C, Voltage Rating=50V, Case/Package=0603, Category="Ceramic Capacitors", China RoHS=Compliant, ComponentLink1Description=https://datasheet.octopart.com:443/CC0603CRNPO9BN3R9-Yageo-datasheet-182140217.pdf?src-supplier=IHS, ComponentLink1URL=https://datasheet.octopart.com:443/CC0603CRNPO9BN3R9-Yageo-datasheet-182140217.pdf?src-supplier=IHS, ComponentLink2Description=https://datasheet.octopart.com:443/CC0603CRNPO9BN3R9-Yageo-Group-datasheet-192360829.pdf?src-supplier=Future+Electronics, ComponentLink2URL=https://datasheet.octopart.com:443/CC0603CRNPO9BN3R9-Yageo-Group-datasheet-192360829.pdf?src-supplier=Future+Electronics, ComponentLink3Description=https://datasheet.octopart.com:443/CC0603CRNPO9BN3R9-Yageo-datasheet-137875056.pdf?src-supplier=Future+Electronics, ComponentLink3URL=https://datasheet.octopart.com:443/CC0603CRNPO9BN3R9-Yageo-datasheet-137875056.pdf?src-supplier=Future+Electronics, ComponentLink4Description=https://datasheet.octopart.com:443/CC0603CRNPO9BN3R9-Yageo-datasheet-136957424.pdf?src-supplier=Future+Electronics, ComponentLink4URL=https://datasheet.octopart.com:443/CC0603CRNPO9BN3R9-Yageo-datasheet-136957424.pdf?src-supplier=Future+Electronics, ComponentLink5Description=https://datasheet.octopart.com:443/CC0603CRNPO9BN3R9-Yageo-datasheet-137700082.pdf?src-supplier=Future+Electronics, ComponentLink5URL=https://datasheet.octopart.com:443/CC0603CRNPO9BN3R9-Yageo-datasheet-137700082.pdf?src-supplier=Future+Electronics, ComponentLink6Description=https://datasheet.octopart.com:443/CC0603CRNPO9BN3R9-Yageo-datasheet-78855684.pdf?src-supplier=Future+Electronics, ComponentLink6URL=https://datasheet.octopart.com:443/CC0603CRNPO9BN3R9-Yageo-datasheet-78855684.pdf?src-supplier=Future+Electronics, ComponentLink7Description=https://datasheet.octopart.com:443/CC0603CRNPO9BN3R9-Yageo-datasheet-62091628.pdf?src-supplier=Future+Electronics, ComponentLink7URL=https://datasheet.octopart.com:443/CC0603CRNPO9BN3R9-Yageo-datasheet-62091628.pdf?src-supplier=Future+Electronics, ComponentLink8Description=https://datasheet.octopart.com:443/CC0603CRNPO9BN3R9-Yageo-datasheet-24578986.pdf?src-supplier=Future+Electronics, ComponentLink8URL=https://datasheet.octopart.com:443/CC0603CRNPO9BN3R9-Yageo-datasheet-24578986.pdf?src-supplier=Future+Electronics, ComponentLink9Description=https://datasheet.octopart.com:443/CC0603CRNPO9BN3R9-Yageo-datasheet-16730043.pdf?src-supplier=Future+Electronics, ComponentLink9URL=https://datasheet.octopart.com:443/CC0603CRNPO9BN3R9-Yageo-datasheet-16730043.pdf?src-supplier=Future+Electronics, ComponentLink10Description=https://datasheet.octopart.com:443/CC0603CRNPO9BN3R9-Yageo-datasheet-15895757.pdf?src-supplier=Future+Electronics, ComponentLink10URL=https://datasheet.octopart.com:443/CC0603CRNPO9BN3R9-Yageo-datasheet-15895757.pdf?src-supplier=Future+Electronics, ComponentLink11Description=https://datasheet.octopart.com:443/CC0603CRNPO9BN3R9-Yageo-datasheet-12589826.pdf?src-supplier=Future+Electronics, ComponentLink11URL=https://datasheet.octopart.com:443/CC0603CRNPO9BN3R9-Yageo-datasheet-12589826.pdf?src-supplier=Future+Electronics, ComponentLink12Description=https://datasheet.octopart.com:443/CC0603CRNPO9BN3R9-Yageo-datasheet-8817079.pdf?src-supplier=Future+Electronics, ComponentLink12URL=https://datasheet.octopart.com:443/CC0603CRNPO9BN3R9-Yageo-datasheet-8817079.pdf?src-supplier=Future+Electronics, ComponentLink13Description=https://datasheet.octopart.com:443/CC0603CRNPO9BN3R9-Yageo-datasheet-8324240.pdf?src-supplier=Future+Electronics, ComponentLink13URL=https://datasheet.octopart.com:443/CC0603CRNPO9BN3R9-Yageo-datasheet-8324240.pdf?src-supplier=Future+Electronics, ComponentLink14Description=https://datasheet.octopart.com:443/CC0603CRNPO9BN3R9-Yageo-datasheet-504625.pdf?src-supplier=Future+Electronics, ComponentLink14URL=https://datasheet.octopart.com:443/CC0603CRNPO9BN3R9-Yageo-datasheet-504625.pdf?src-supplier=Future+Electronics, ComponentLink15Description=https://datasheet.octopart.com:443/CC0603CRNPO9BN3R9-Yageo-datasheet-181967802.pdf?src-supplier=Newark, ComponentLink15URL=https://datasheet.octopart.com:443/CC0603CRNPO9BN3R9-Yageo-datasheet-181967802.pdf?src-supplier=Newark, ComponentLink16Description=https://datasheet.octopart.com:443/CC0603CRNPO9BN3R9-Yageo-datasheet-5321569.pdf?src-supplier=Newark, ComponentLink16URL=https://datasheet.octopart.com:443/CC0603CRNPO9BN3R9-Yageo-datasheet-5321569.pdf?src-supplier=Newark, ComponentLink17Description=https://datasheet.octopart.com:443/CC0603CRNPO9BN3R9-Yageo-datasheet-151948684.pdf?src-supplier=Newark, ComponentLink17URL=https://datasheet.octopart.com:443/CC0603CRNPO9BN3R9-Yageo-datasheet-151948684.pdf?src-supplier=Newark, ComponentLink18Description=https://datasheet.octopart.com:443/CC0603CRNPO9BN3R9-Yageo-datasheet-67645495.pdf?src-supplier=Newark, ComponentLink18URL=https://datasheet.octopart.com:443/CC0603CRNPO9BN3R9-Yageo-datasheet-67645495.pdf?src-supplier=Newark, ComponentLink19Description=https://datasheet.octopart.com:443/CC0603CRNPO9BN3R9-Yageo-datasheet-10406438.pdf?src-supplier=element14+APAC, ComponentLink19URL=https://datasheet.octopart.com:443/CC0603CRNPO9BN3R9-Yageo-datasheet-10406438.pdf?src-supplier=element14+APAC, ComponentLink20Description=https://datasheet.octopart.com:443/CC0603CRNPO9BN3R9-Yageo-datasheet-65873193.pdf?src-supplier=Farnell, ComponentLink20URL=https://datasheet.octopart.com:443/CC0603CRNPO9BN3R9-Yageo-datasheet-65873193.pdf?src-supplier=Farnell, ComponentLink21Description=https://datasheet.octopart.com:443/CC0603CRNPO9BN3R9-Yageo-datasheet-10621397.pdf?src-supplier=Farnell, ComponentLink21URL=https://datasheet.octopart.com:443/CC0603CRNPO9BN3R9-Yageo-datasheet-10621397.pdf?src-supplier=Farnell, ComponentLink22Description=https://datasheet.octopart.com:443/CC0603CRNPO9BN3R9-Yageo-Group-datasheet-188129580.pdf?src-supplier=LCSC, ComponentLink22URL=https://datasheet.octopart.com:443/CC0603CRNPO9BN3R9-Yageo-Group-datasheet-188129580.pdf?src-supplier=LCSC, ComponentLink23Description=http://sigma.octopart.com:80/conflict_mineral_statement/Yageo-company-3.pdf?src-supplier=Compliance+Statements, ComponentLink23URL=http://sigma.octopart.com:80/conflict_mineral_statement/Yageo-company-3.pdf?src-supplier=Compliance+Statements, ComponentLink24Description=http://sigma.octopart.com:80/rohs_statement/Yageo-company-2.pdf?src-supplier=Compliance+Statements, ComponentLink24URL=http://sigma.octopart.com:80/rohs_statement/Yageo-company-2.pdf?src-supplier=Compliance+Statements, Composition=Ceramic, Depth=800µm, Halogen Free="Halogen Free", Height=800µm, Lead Free="Lead Free", Length=1.6mm, Lifecycle Status=Production, Manufacturer Part Number=CC0603CRNPO9BN3R9, Mounting Technology="Surface Mount", Number of Terminals=2, Packaging="Cut Tape", Pins=2, Pricing="1=0.1, 10=0.052, 50=0.0356, 100=0.0304, 500=0.02192 (USD)", Radiation Hardening=No, REACH SVHC=Yes, RoHS=Compliant, Stock=14773, Supplier=DigiKey, Termination=SMD/SMT, Thickness=889µm, Voltage Rating (AC)=50V, Voltage Rating (DC)=50V, Width=800µm
C3 C4: library part CC0603BRNPO9BN1R5, "Surface Mount Ceramic Multilayer Capacitor 1.5pF 0.1pF C0G 50V 0603 Paper T/R", Case Code (Imperial)=0603, Case Code (Metric)=1608, Dielectric=C0G, Dielectric Material=Ceramic, Manufacturer="Yageo Group", Max Operating Temperature=125°C, Min Operating Temperature=-55°C, Supplier Part Number=311-1737-1-ND, Voltage Rating=50V, Case/Package=0603, Category="Ceramic Capacitors", China RoHS=Compliant, ComponentLink1Description=https://datasheet.octopart.com:443/CC0603BRNPO9BN1R5-Yageo-datasheet-182140217.pdf?src-supplier=IHS, ComponentLink1URL=https://datasheet.octopart.com:443/CC0603BRNPO9BN1R5-Yageo-datasheet-182140217.pdf?src-supplier=IHS, ComponentLink2Description=https://datasheet.octopart.com:443/CC0603BRNPO9BN1R5-Yageo-datasheet-182029500.pdf?src-supplier=Newark, ComponentLink2URL=https://datasheet.octopart.com:443/CC0603BRNPO9BN1R5-Yageo-datasheet-182029500.pdf?src-supplier=Newark, ComponentLink3Description=https://datasheet.octopart.com:443/CC0603BRNPO9BN1R5-Yageo-datasheet-151948684.pdf?src-supplier=element14+APAC, ComponentLink3URL=https://datasheet.octopart.com:443/CC0603BRNPO9BN1R5-Yageo-datasheet-151948684.pdf?src-supplier=element14+APAC, ComponentLink4Description=https://datasheet.octopart.com:443/CC0603BRNPO9BN1R5-Yageo-Group-datasheet-188129580.pdf?src-supplier=LCSC, ComponentLink4URL=https://datasheet.octopart.com:443/CC0603BRNPO9BN1R5-Yageo-Group-datasheet-188129580.pdf?src-supplier=LCSC, ComponentLink5Description=https://datasheet.octopart.com:443/CC0603BRNPO9BN1R5-Yageo-datasheet-137875056.pdf?src-supplier=Future+Electronics, ComponentLink5URL=https://datasheet.octopart.com:443/CC0603BRNPO9BN1R5-Yageo-datasheet-137875056.pdf?src-supplier=Future+Electronics, ComponentLink6Description=https://datasheet.octopart.com:443/CC0603BRNPO9BN1R5-Yageo-datasheet-136957424.pdf?src-supplier=Future+Electronics, ComponentLink6URL=https://datasheet.octopart.com:443/CC0603BRNPO9BN1R5-Yageo-datasheet-136957424.pdf?src-supplier=Future+Electronics, ComponentLink7Description=https://datasheet.octopart.com:443/CC0603BRNPO9BN1R5-Yageo-datasheet-137700082.pdf?src-supplier=Future+Electronics, ComponentLink7URL=https://datasheet.octopart.com:443/CC0603BRNPO9BN1R5-Yageo-datasheet-137700082.pdf?src-supplier=Future+Electronics, ComponentLink8Description=https://datasheet.octopart.com:443/CC0603BRNPO9BN1R5-Yageo-datasheet-78855684.pdf?src-supplier=Future+Electronics, ComponentLink8URL=https://datasheet.octopart.com:443/CC0603BRNPO9BN1R5-Yageo-datasheet-78855684.pdf?src-supplier=Future+Electronics, ComponentLink9Description=https://datasheet.octopart.com:443/CC0603BRNPO9BN1R5-Yageo-datasheet-16730043.pdf?src-supplier=Future+Electronics, ComponentLink9URL=https://datasheet.octopart.com:443/CC0603BRNPO9BN1R5-Yageo-datasheet-16730043.pdf?src-supplier=Future+Electronics, ComponentLink10Description=https://datasheet.octopart.com:443/CC0603BRNPO9BN1R5-Yageo-datasheet-12589826.pdf?src-supplier=Future+Electronics, ComponentLink10URL=https://datasheet.octopart.com:443/CC0603BRNPO9BN1R5-Yageo-datasheet-12589826.pdf?src-supplier=Future+Electronics, ComponentLink11Description=https://datasheet.octopart.com:443/CC0603BRNPO9BN1R5-Yageo-datasheet-10406438.pdf?src-supplier=Future+Electronics, ComponentLink11URL=https://datasheet.octopart.com:443/CC0603BRNPO9BN1R5-Yageo-datasheet-10406438.pdf?src-supplier=Future+Electronics, ComponentLink12Description=https://datasheet.octopart.com:443/CC0603BRNPO9BN1R5-Yageo-datasheet-8817079.pdf?src-supplier=Future+Electronics, ComponentLink12URL=https://datasheet.octopart.com:443/CC0603BRNPO9BN1R5-Yageo-datasheet-8817079.pdf?src-supplier=Future+Electronics, ComponentLink13Description=https://datasheet.octopart.com:443/CC0603BRNPO9BN1R5-Yageo-datasheet-8324240.pdf?src-supplier=Future+Electronics, ComponentLink13URL=https://datasheet.octopart.com:443/CC0603BRNPO9BN1R5-Yageo-datasheet-8324240.pdf?src-supplier=Future+Electronics, ComponentLink14Description=https://datasheet.octopart.com:443/CC0603BRNPO9BN1R5-Yageo-datasheet-504625.pdf?src-supplier=Future+Electronics, ComponentLink14URL=https://datasheet.octopart.com:443/CC0603BRNPO9BN1R5-Yageo-datasheet-504625.pdf?src-supplier=Future+Electronics, ComponentLink15Description=https://datasheet.octopart.com:443/CC0603BRNPO9BN1R5-Yageo-datasheet-5321569.pdf?src-supplier=Future+Electronics, ComponentLink15URL=https://datasheet.octopart.com:443/CC0603BRNPO9BN1R5-Yageo-datasheet-5321569.pdf?src-supplier=Future+Electronics, ComponentLink16Description=http://sigma.octopart.com:80/conflict_mineral_statement/Yageo-company-3.pdf?src-supplier=Compliance+Statements, ComponentLink16URL=http://sigma.octopart.com:80/conflict_mineral_statement/Yageo-company-3.pdf?src-supplier=Compliance+Statements, ComponentLink17Description=http://sigma.octopart.com:80/rohs_statement/Yageo-company-2.pdf?src-supplier=Compliance+Statements, ComponentLink17URL=http://sigma.octopart.com:80/rohs_statement/Yageo-company-2.pdf?src-supplier=Compliance+Statements, Composition=Ceramic, Country of Origin="Mainland China, Taiwan", Depth=800µm, Export Control Classification Number (ECCN) Code=EAR99, Halogen Free="Halogen Free", Harmonized Tariff Schedule (HTS) Code=8532.24.00.20, Height=800µm, Introduction Date=2003-08-13, Lead Free="Lead Free", Length=1.6mm, Lifecycle Status=Production, Manufacturer Part Number=CC0603BRNPO9BN1R5, Mounting Technology="Surface Mount", Number of Terminals=2, Packaging="Tape and Reel", Pricing="1=0.13, 10=0.069, 50=0.0474, 100=0.0409, 500=0.02988 (USD)", Radiation Hardening=No, REACH SVHC=Yes, RoHS=Compliant, Schedule B="8532240020, 8532240020|8532240020|8532240020|8532240020|8532240020", Stock=1814, Supplier=DigiKey, Termination=SMD/SMT, Thickness=889µm, Voltage Rating (DC)=50V, Width=800µm